# Altium PCB Sampler.PCBDOC (part 7 of 7)
Units mil, origin at the board's own origin, x right, y up, seen from the top; angles counter-clockwise.
Board outline 6299 x 3937 mil, 4 copper layers (Top, GP1(GND), L3, Bot), stack 64.883 mil thick; 567 components, 323 nets, 1698 pads, 817 vias.
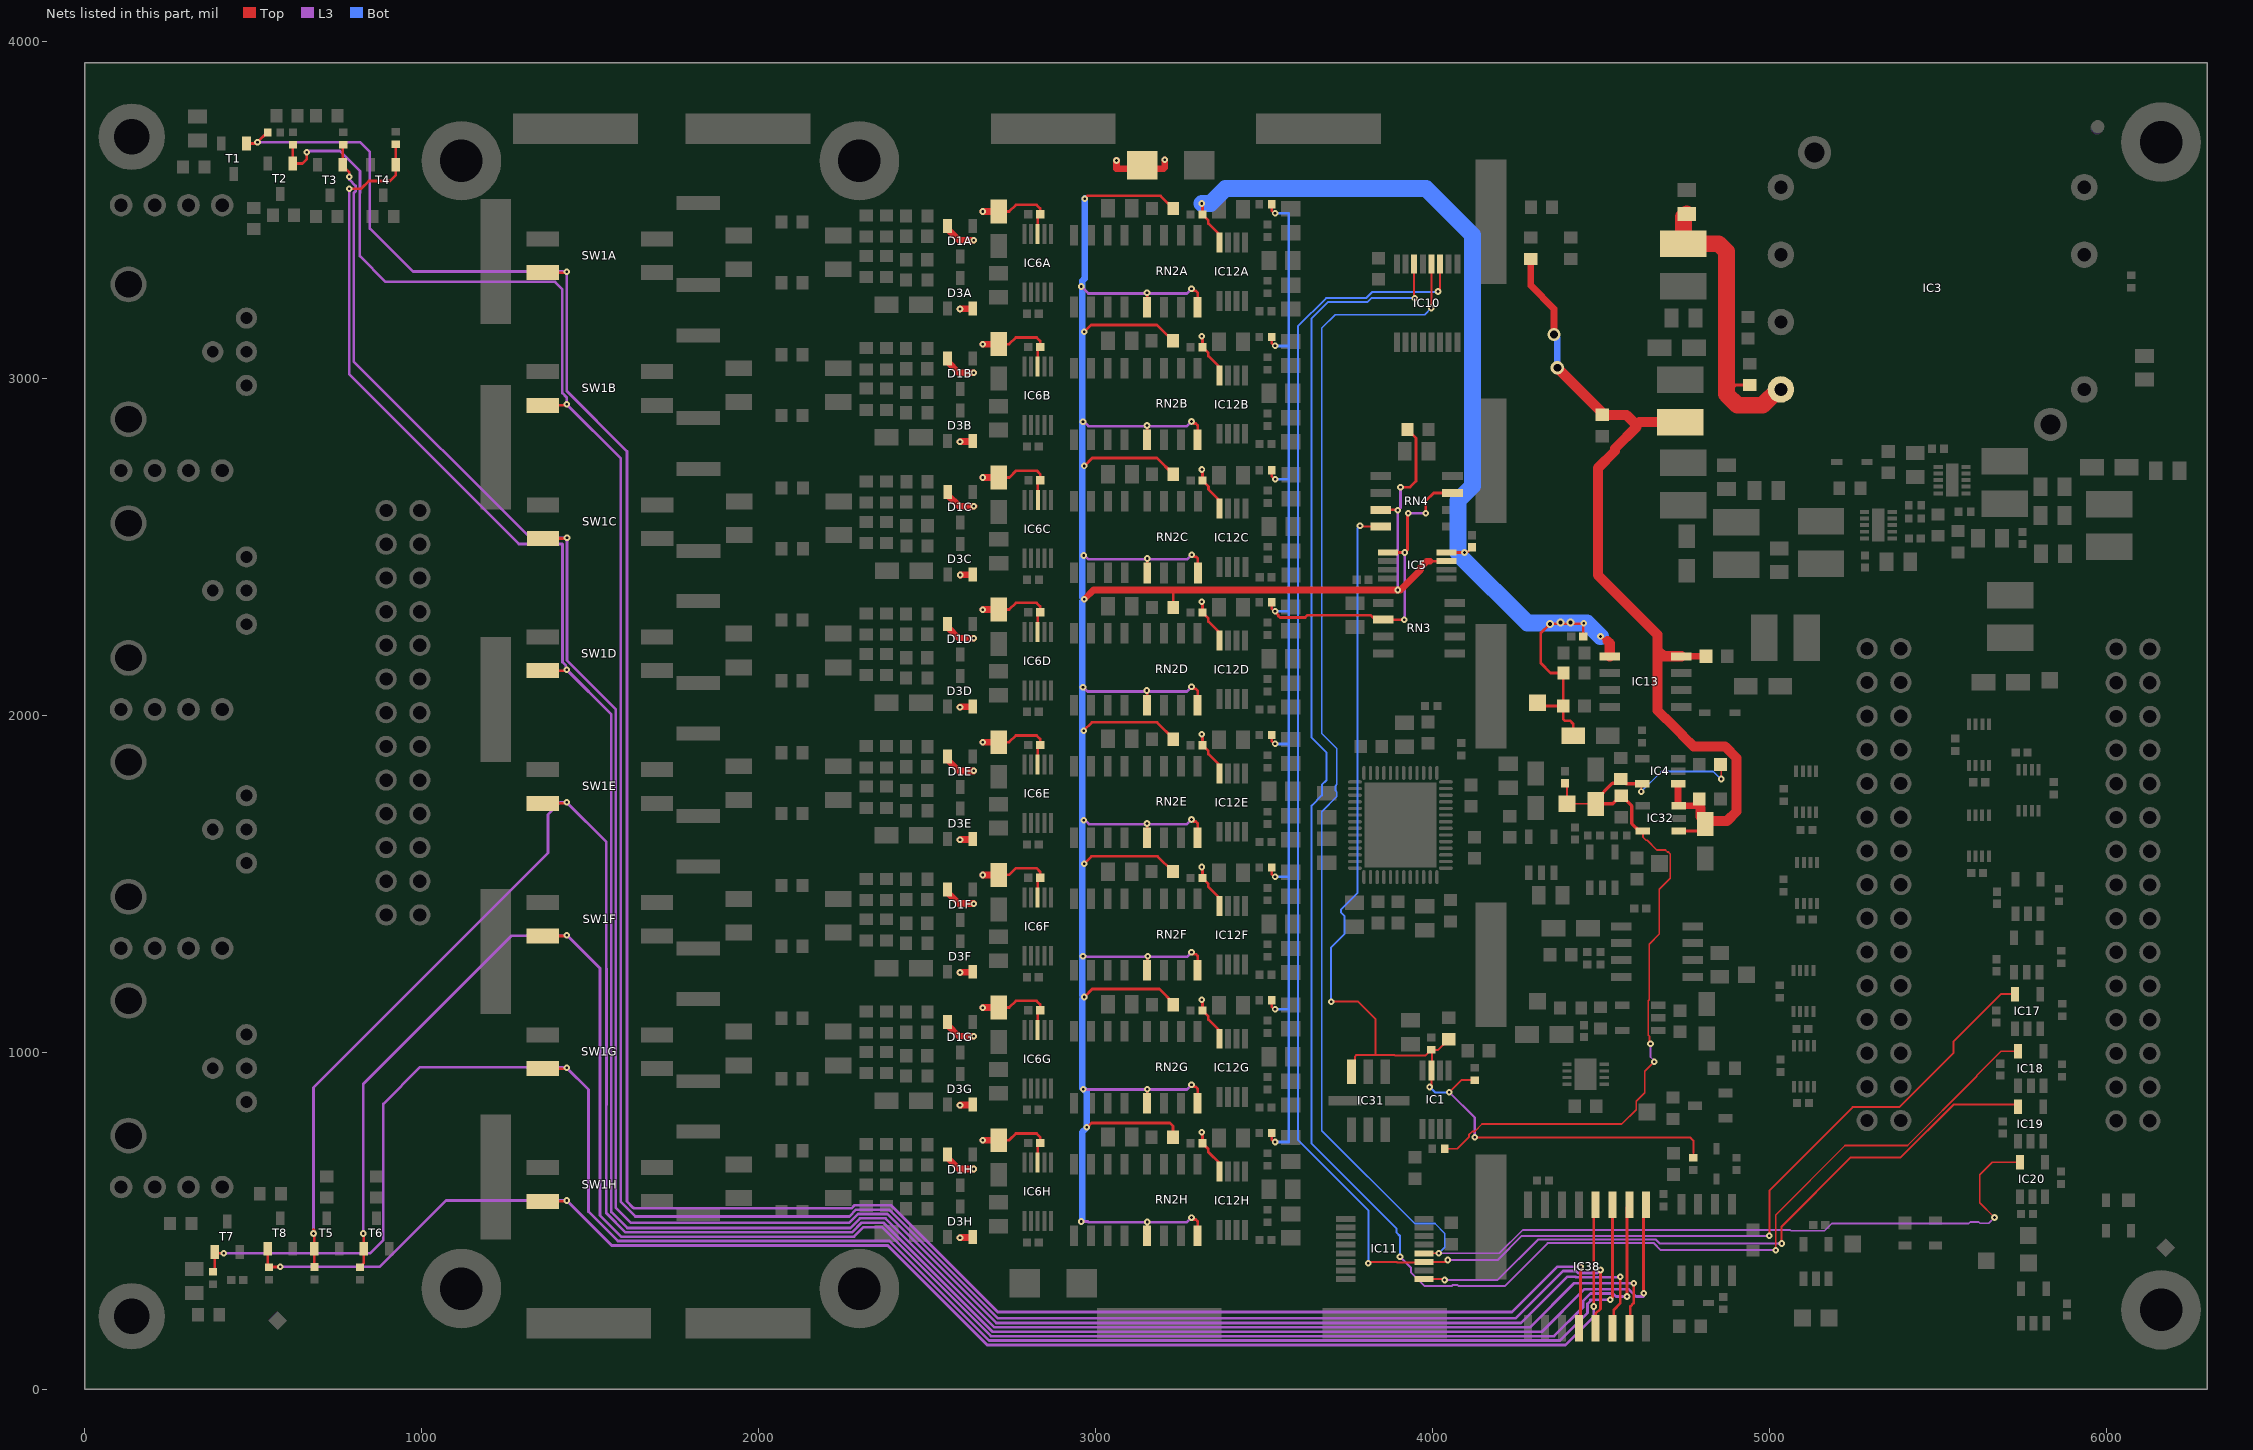
[diagram p8: the nets of this part, all layers, seen from the top]

## Via types
v1: diameter 19.68, hole 7.87, Top to Bot, tented both sides, 772 vias
v2: diameter 23.62, hole 11.81, Top to Bot, tented both sides, 17 vias
v3: diameter 19.68, hole 7.87, Top to Bot, 11 vias
v4: diameter 39.37, hole 23.62, Top to Bot, tented both sides, 7 vias
v5: diameter 23.62, hole 11.81, Top to Bot, 6 vias
v6: diameter 50, hole 28, Top to Bot, 4 vias

## Nets (pads, with @x,y where several pads share a name; then routed paths per layer and width w, separated by ;. In a path a pad name is that pad's centre, name@x,y a point inside that pad or via, vN(x,y) a via of type N, cw(c..) or ccw(c..) an arc to the next point about the centre after c; other vN are vias at no path point) (continued)
P12V0A: C10A.1 C10B.1 C10C.1 C10D.1 C10E.1 C10F.1 C10G.1 C10H.1 C20.2 C30.2 C35A.2 C35B.2 C35C.2 C35D.2 C35E.2 C35F.2 C35G.2 C35H.2 C51.1 C65.2 C70A.2 C70B.2 C70C.2 C70D.2 C70E.2 C70F.2 C70G.2 C70H.2 D1A.2 D1B.2 D1C.2 D1D.2 D1E.2 D1F.2 D1G.2 D1H.2 D3A.2 D3B.2 D3C.2 D3D.2 D3E.2 D3F.2 D3G.2 D3H.2 D8.1 IC5.8 IC6A.8 IC6B.8 IC6C.8 IC6D.8 IC6E.8 IC6F.8 IC6G.8 IC6H.8 IC12A.8 IC12B.8 IC12C.8 IC12D.8 IC12E.8 IC12F.8 IC12G.8 IC12H.8 IC13.1 R142.2 TP7.1 | length 7621.1
  Top w8: C10H.1@2712,739.27 2743.5,739.27 2763.32,759.09 2825,759.09 2835.48,748.62 C35H.2@2835.48,731.03 2828,723.55 IC6H.8@2828,672.71 ; C10G.1@2712,1132.98 2743.5,1132.98 2763.32,1152.8 2825,1152.8 2835.48,1142.32 C35G.2@2835.48,1124.73 2828,1117.25 IC6G.8@2828,1066.41 ; C10F.1@2712,1526.68 2743.5,1526.68 2763.32,1546.5 2825,1546.5 2835.48,1536.02 C35F.2@2835.48,1518.43 2828,1510.96 IC6F.8@2828,1460.11 ; C10E.1@2712,1920.38 2743.5,1920.38 2763.32,1940.2 2825,1940.2 2835.48,1929.72 C35E.2@2835.48,1912.13 2828,1904.66 IC6E.8@2828,1853.81 ; C10D.1@2712,2314.08 2743.5,2314.08 2763.32,2333.9 2825,2333.9 2835.48,2323.42 C35D.2@2835.48,2305.83 2828,2298.36 IC6D.8@2828,2247.51 ; C10B.1@2712,3101.48 2743.5,3101.48 2763.32,3121.3 2825,3121.3 2835.48,3110.82 C35B.2@2835.48,3093.24 2828,3085.76 IC6B.8@2828,3034.92 ; C10A.1@2712,3495.18 2743.5,3495.18 2763.32,3515 2825,3515 2835.48,3504.52 C35A.2@2835.48,3486.94 2828,3479.46 IC6A.8@2828,3428.61 ; C10C.1@2712.49,2706.05 2743.99,2706.05 2763.81,2725.87 2825.49,2725.87 2835.97,2715.4 C35C.2@2835.97,2697.81 2828.49,2690.33 IC6C.8@2828.49,2639.49 ; v1(3314.96,762.8) 3316.93,760.83 C70H.2@3316.93,730.31 3334.65,712.6 3334.65,703.74 3367.13,671.26 IC12H.8@3367.13,646.8 ; v1(3314.96,1156.5) 3316.93,1154.53 C70G.2@3316.93,1124.02 3334.65,1106.3 3334.65,1097.44 3367.13,1064.96 IC12G.8@3367.13,1040.5 ; v1(3314.96,1550.2) 3316.93,1548.23 C70F.2@3316.93,1517.72 3334.65,1500 3334.65,1491.14 3367.13,1458.66 IC12F.8@3367.13,1434.2 ; v1(3314.96,1943.9) 3316.93,1941.93 C70E.2@3316.93,1911.42 3334.65,1893.7 3334.65,1884.84 3367.13,1852.36 IC12E.8@3367.13,1827.9 ; v1(3314.96,2337.6) 3316.93,2335.63 C70D.2@3316.93,2305.12 3334.65,2287.4 3334.65,2278.54 3367.13,2246.06 IC12D.8@3367.13,2221.6 ; v1(3314.96,3125) 3316.93,3123.03 C70B.2@3316.93,3092.52 3334.65,3074.8 3334.65,3065.94 3367.13,3033.46 IC12B.8@3367.13,3009 ; v1(3314.96,3518.7) 3316.93,3516.73 C70A.2@3316.93,3486.22 3334.65,3468.5 3334.65,3459.65 3367.13,3427.17 IC12A.8@3367.13,3402.7 ; v1(3315.45,2729.58) 3317.42,2727.61 C70C.2@3317.42,2697.1 3335.14,2679.38 3335.14,2670.52 3367.62,2638.04 IC12C.8@3367.62,2613.58 ; IC5.8@4041.34,2483.27 v1(4094.49,2483.27) 4101.38,2483.27 C20.2@4117.13,2499.02 ; TP7.1@4311.02,2037.4 4320.87,2027.56 C65.2@4387.8,2027.56 ; C51.1@4417.32,1938.98 4417.32,1974.41 4407.48,1984.25 4391.73,1984.25 4387.8,1988.19 C65.2@4387.8,2027.56 ; C30.2@4446.85,2234.25 4446.85,2271.65 v2(4348.43,2271.65) 4320.87,2244.09 4320.87,2155.51 4350.39,2125.98 R142.2@4387.8,2125.98 C65.2@4387.8,2027.56 ; v1(4498.03,2234.25) 4515.26,2217.03
  Top w20: D1H.2@2560.6,696.37 2560.6,687.31 2593.81,654.09 v1(2638.31,654.09) ; D1G.2@2560.6,1090.07 2560.6,1081.01 2593.81,1047.8 v1(2638.31,1047.8) ; D1F.2@2560.6,1483.77 2560.6,1474.71 2593.81,1441.5 v1(2638.31,1441.5) ; D1E.2@2560.6,1877.47 2560.6,1868.41 2593.81,1835.2 v1(2638.31,1835.2) ; D1D.2@2560.6,2271.17 2560.6,2262.11 2593.81,2228.9 v1(2638.31,2228.9) ; D1B.2@2560.6,3058.57 2560.6,3049.51 2593.81,3016.3 v1(2638.31,3016.3) ; D1A.2@2560.6,3452.28 2560.6,3443.21 2593.81,3410 v1(2638.31,3410) ; D1C.2@2561.09,2663.15 2561.09,2654.09 2594.3,2620.87 v1(2638.8,2620.87) ; v1(2597.78,449.76) 2598.51,450.48 D3H.2@2633.61,450.48 ; v1(2597.78,843.46) 2598.51,844.18 D3G.2@2633.61,844.18 ; v1(2597.78,1237.16) 2598.51,1237.88 D3F.2@2633.61,1237.88 ; v1(2597.78,1630.86) 2598.51,1631.58 D3E.2@2633.61,1631.58 ; v1(2597.78,2024.56) 2598.51,2025.28 D3D.2@2633.61,2025.28 ; v1(2597.78,2811.96) 2598.51,2812.68 D3B.2@2633.61,2812.68 ; v1(2597.78,3205.66) 2598.51,3206.38 D3A.2@2633.61,3206.38 ; v1(2598.28,2416.54) 2599,2417.26 D3C.2@2634.11,2417.26 ; v1(2665,739.09) 2665.18,739.27 C10H.1@2712,739.27 ; v1(2665,1132.8) 2665.18,1132.98 C10G.1@2712,1132.98 ; v1(2665,1526.5) 2665.18,1526.68 C10F.1@2712,1526.68 ; v1(2665,1920.2) 2665.18,1920.38 C10E.1@2712,1920.38 ; v1(2665,2313.9) 2665.18,2314.08 C10D.1@2712,2314.08 ; v1(2665,3101.3) 2665.18,3101.48 C10B.1@2712,3101.48 ; v1(2665,3495) 2665.18,3495.18 C10A.1@2712,3495.18 ; v1(2665.49,2705.87) 2665.67,2706.05 C10C.1@2712.49,2706.05 ; v1(3062.05,3646.37) 3062.05,3622.05 3202.04,3622.05 3205.05,3625.05 v1(3205.05,3648.37)
  Top w30: 4518.7,2220.47 4525.55,2213.62 IC13.1@4525.55,2175.37
  Bot w50: v1(3314.96,3518.7) 3341.54,3518.7 3385.83,3562.99 3980.32,3562.99 4118.11,3425.2 4118.11,2681.1 4074.8,2637.8 4074.8,2483.27 ; 4083.17,2471.95 4281.02,2274.09 4448.35,2274.09 v1(4448.82,2273.62) 4458.66,2273.62 v1(4498.03,2234.25)
  other v2: 4378.94,2275.59 4409.45,2275.59
P13V0: C29.2 C77.1 C112.2 C117.2 IC4.1 IC13.8 IC32.1 IC32.3 L11.2 R3.2 | length 2746.8
  Top w10: IC32.1@4730.32,1656.87 4789.45,1656.87 4809.06,1676.48 C77.1@4809.06,1677.17
  Top w20: R3.2@4291.34,3354.33 4291.34,3275.31 4360.24,3206.41 v4(4360.24,3129.92) ; IC4.1@4728.35,1796.81 4728.35,1732.5 4729.17,1731.67 IC32.3@4730.32,1731.67 4787.52,1731.67 ; IC13.8@4738.15,2175.37 4810.85,2175.37 C112.2@4811.02,2175.2 ; C117.2@4791.34,1751.97 4787.52,1748.15 4787.52,1731.67 ; 4794.29,1724.9 4787.52,1731.67
  Top w30: v4(4370.08,3031.5) C29.2@4506.4,2895.18 ; C29.2@4502.95,2891.73 4575.79,2891.73 4575.79,2890.75 4605.32,2861.22 4605.32,2856.04 4541.02,2791.75 4541.02,2784.25 4490.16,2733.39 4490.16,2416.34 4667.32,2239.17 4667.32,2193.9 ; 4614.17,2870.08 L11.2@4734.25,2870.08 ; IC13.8@4738.15,2175.37 4685.85,2175.37 4667.32,2193.9 ; 4794.29,1724.9 4794.29,1700.79 4808.07,1687.01 4874.02,1687.01 4901.57,1714.57 4901.57,1873.77 4867.86,1907.48 4774.61,1907.48 4741.69,1940.39 4741.69,1941.54 4692.21,1991.02 4691.06,1991.02 4667.32,2014.76 4667.32,2193.9
  Bot w20: v4(4360.24,3129.92) 4370.08,3120.08 v4(4370.08,3031.5)
P13V0S: C26.2 IC3.7 L10.1 R7.2 | length 928.3
  Top w8: 4872.05,2952.76 4899.61,2980.31 R7.2@4940.94,2980.31
  Top w50: C26.2@4753.94,3488.19 4744.09,3478.35 L10.1@4744.09,3399.61 4848.43,3399.61 4872.05,3375.98 4872.05,2952.76 4904.66,2920.15 4978.71,2920.15 5025.69,2967.13 IC3.7@5033.46,2967.13
PGIA-CS: IC10.12 IC11.12 IC20.5 | length 5482
  Top w5: IC11.12@3974.6,403.8 v1(4017.98,403.8) ; v1(3996.06,3208.66) 3996.44,3209.04 IC10.12@3996.44,3339.26 ; v1(5667.36,509.88) 5623.52,553.73 5623.52,636.81 5660.89,674.19 IC20.5@5742.38,674.19
  L3 w5: v1(4017.98,403.8) 4198.01,403.8 4267.28,473.07 5061.26,473.07 5064.04,470.29 5162.93,470.29 5184.72,492.07 5590.68,492.07 5595.12,496.52 5620.5,496.52 5624.48,492.54 5650.02,492.54 v1(5667.36,509.88)
  Bot w5: v1(3996.06,3208.66) 3976.38,3188.98 3710.63,3188.98 3671.26,3149.61 3671.26,2472.89 3671.37,2472.78 3671.37,2432.73 3671.26,2432.62 3671.26,1946.43 3715.95,1901.74 3715.95,1795.5 3712.07,1791.62 3712.07,1776.59 3715.95,1772.7 3715.95,1759.05 3671.26,1714.36 3671.26,767.72 3946.85,492.13 4006.89,492.13 4036.41,462.6 4036.41,422.23 v1(4017.98,403.8)
PGIA-MISO: IC11.9 IC19.5 | length 2020.8
  Top w6: IC11.9@3974.6,327.03 4033.21,327.03 v1(4035.43,324.8) ; v1(5035.68,433.09) 5035.68,483.3 5240.93,688.55 5389.01,688.55 5545.59,845.13 5730.43,845.13 IC19.5@5737.1,838.46
  L3 w6: v1(4035.43,324.8) 4192.91,324.8 4312.84,444.73 4661.46,444.73 4673.12,433.07 v1(5035.68,433.09)
PGIA-MOSI: IC10.14 IC18.5 | length 5612.3
  Top w5: v1(5017.72,413.39) 5017.72,517.64 5223.57,723.49 5409.1,723.49 5614.33,928.72 5614.33,931.34 5686.28,1003.29 IC18.5@5737.54,1003.29
  Top w6: IC10.14@3945.26,3339.26 3945.26,3239.78 v1(3946.85,3238.19)
  L3 w6: v1(3903.19,393.7) 3935.17,361.72 3935.17,347.57 3976.38,306.36 4056.72,306.36 4059.54,309.18 4074.32,309.18 4077.14,306.36 4213.84,306.36 4341.21,433.73 4656.91,433.73 4677.25,413.39 v1(5017.72,413.39)
  Bot w6: v1(3903.19,393.7) 3903.19,455.08 3893.37,464.9 3893.37,476.71 3640.76,729.32 3640.76,1732.28 3671.26,1762.78 3671.26,1793.94 3685.45,1808.13 3685.45,1889.11 3640.76,1933.8 3640.76,2445.25 3640.87,2445.37 3640.87,2460.15 3640.76,2460.26 3640.76,3178.16 3689.79,3227.19 3806.93,3227.19 3817.93,3238.19 v1(3946.85,3238.19)
PGIA-SCK: IC10.11 IC11.11 IC17.5 | length 5760.1
  Top w6: v1(3809.06,374.02) 3813.25,378.21 3893.44,378.21 3895.8,375.86 3972.25,375.86 IC11.11@3974.6,378.21 4039.63,378.21 v1(4045.28,383.86) ; v1(4015.75,3257.87) 4022.03,3264.16 IC10.11@4022.03,3339.26 ; v1(4999.02,455.73) 4999.02,590.05 5246.25,837.28 5384.48,837.28 5545.76,998.57 5545.76,1032.77 5686.04,1173.05 IC17.5@5728.23,1173.05
  L3 w6: v1(4045.28,383.86) 4192.91,383.86 4264.78,455.73 v1(4999.02,455.73)
  Bot w6: v1(3809.06,374.02) 3809.06,531.5 3600.27,740.28 3600.27,3154.55 3683.91,3238.19 3802.37,3238.19 3820.21,3256.03 4013.91,3256.03 v1(4015.75,3257.87)
REF_P1V7066: IC5.7 R72.2 R73A.1 R73B.1 R73C.1 R73D.1 R73E.1 R73F.1 R73G.1 R73H.1 RN2A.5 RN2A.8 RN2B.5 RN2B.8 RN2C.5 RN2C.8 RN2D.5 RN2D.8 RN2E.5 RN2E.8 RN2F.5 RN2F.8 RN2G.5 RN2G.8 RN2H.5 RN2H.8 RN4.7 | length 10384.3
  Top w8: v1(2964.57,1954.72) 2989.17,1979.33 3182.09,1979.33 3230.31,1931.1 R73E.1@3230.31,1929.13 ; v1(2966.39,1164.37) 2990.02,1187.99 3188.98,1187.99 3230.31,1146.65 R73G.1@3230.31,1141.73 ; v1(2966.39,1560.04) 2988.05,1581.69 3184.06,1581.69 R73F.1@3229.33,1536.42 ; v1(2966.39,2740.16) 2990.02,2763.78 3182.09,2763.78 R73C.1@3230.31,2715.55 ; v1(2966.39,3138.78) 2986.08,3158.46 3182.09,3158.46 R73B.1@3229.33,3111.22 ; v1(2967.52,3533.46) 2975.54,3541.48 3192.77,3541.48 R73A.1@3230.31,3503.94 ; v1(2973.57,777.6) 2975.43,777.6 2988.19,790.35 3220.47,790.35 3229.33,781.5 R73H.1@3229.33,748.03 ; v1(3151.57,2073.82) 3152.77,2072.62 RN2D.5@3152.77,2030.53 ; v1(3152.56,1679.13) 3152.77,1678.92 RN2E.5@3152.77,1636.83 ; v1(3152.56,2860.24) 3152.77,2860.02 RN2B.5@3152.77,2817.93 ; v1(3152.56,3253.94) 3152.77,3253.72 RN2A.5@3152.77,3211.63 ; RN2H.5@3152.77,455.72 v1(3152.77,496.83) ; RN2G.5@3152.77,849.43 v1(3152.77,890.96) ; RN2F.5@3152.77,1243.13 3152.77,1283.68 v1(3154.53,1285.43) ; RN2C.5@3153.27,2422.5 3153.27,2465.27 v1(3153.54,2465.55) ; R73D.1@3230.31,2319.88 3230.31,2369.04 3233.27,2371.99 ; v1(3284.45,509.84) 3290.35,503.94 3297.24,503.94 3302.77,498.41 RN2H.8@3302.77,455.72 ; v1(3284.45,903.54) 3290.35,897.64 3297.24,897.64 3302.77,892.11 RN2G.8@3302.77,849.43 ; v1(3284.45,1297.24) 3290.35,1291.34 3297.24,1291.34 3302.77,1285.81 RN2F.8@3302.77,1243.13 ; v1(3284.45,1690.94) 3290.35,1685.04 3297.24,1685.04 3302.77,1679.51 RN2E.8@3302.77,1636.83 ; v1(3284.45,2084.65) 3290.35,2078.74 3297.24,2078.74 3302.77,2073.21 RN2D.8@3302.77,2030.53 ; v1(3284.45,2872.05) 3290.35,2866.14 3297.24,2866.14 3302.77,2860.61 RN2B.8@3302.77,2817.93 ; v1(3284.45,3265.75) 3290.35,3259.84 3297.24,3259.84 3302.77,3254.31 RN2A.8@3302.77,3211.63 ; v1(3284.94,2476.62) 3290.85,2470.72 3297.74,2470.72 3303.27,2465.19 RN2C.8@3303.27,2422.5 ; RN4.7@3846.46,2609.84 3895.08,2609.84 v1(3896.65,2608.27) ; v1(3904.53,2677.17) 3933.07,2677.17 3950.79,2694.88 3950.79,2822.83 R72.2@3925.2,2848.43 ; 3992.05,2457.68 IC5.7@4041.34,2457.68
  Top w20: v1(2966.39,2344.49) 2993.9,2371.99 3233.27,2371.99 3904.47,2371.99 3964.33,2431.85 3964.33,2438.44 3983.57,2457.68 3992.05,2457.68
  L3 w8: v1(2957.68,498.03) 2976.38,498.03 2978.35,496.06 3270.67,496.06 v1(3284.45,509.84) ; v1(2957.68,3272.64) 2978.35,3251.97 3270.67,3251.97 v1(3284.45,3265.75) ; v1(2962.6,1285.43) 2964.57,1283.46 3270.67,1283.46 v1(3284.45,1297.24) ; v1(2962.74,2083.76) 2975.64,2070.87 3270.67,2070.87 v1(3284.45,2084.65) ; v1(2963.73,890.79) 2964.76,889.76 3270.67,889.76 v1(3284.45,903.54) ; v1@2964.08,2872.54 2978.35,2858.27 3270.67,2858.27 v1(3284.45,2872.05) ; v1@2965.93,2475.75 2978.84,2462.84 3271.16,2462.84 v1(3284.94,2476.62) ; v1@2966.5,1690.84 2980.17,1677.17 3270.67,1677.17 v1(3284.45,1690.94) ; v1(3896.65,2372.05) v1(3896.65,2608.27) 3904.53,2616.14 v1(3904.53,2677.17)
  Bot w20: v1(2957.68,498.03) 2960.39,500.75 2960.39,763.24 2973.57,776.42 v1(2973.57,777.6) 2973.57,880.95 v1(2963.73,890.79) 2960.39,894.13 2960.39,1158.37 v1(2966.39,1164.37) 2960.39,1170.37 2960.39,1954.72 2960.39,2338.49 v1(2966.39,2344.49) 2960.39,2350.49 2960.39,2740.16 2960.39,3288.83 2967.52,3295.96 v1(2967.52,3533.46)
  other v1: 2964.71,1689.06 2964.71,2474.53 2962.74,2871.2
REF_P2V048: IC5.1 R50A.1 R50B.1 R50C.1 R50D.1 R50E.1 R50F.1 R50G.1 R50H.1 RN3.6 RN4.3 | length 4267.9
  Top w8: R50H.1@3522.44,760.83 3522.44,742.32 3531.5,733.27 v1(3532.48,734.25) ; R50G.1@3522.44,1154.53 3522.44,1136.02 3531.5,1126.97 v1(3532.48,1127.95) ; R50F.1@3522.44,1548.23 3522.44,1529.72 3531.5,1520.67 v1(3532.48,1521.65) ; R50E.1@3522.44,1941.93 3522.44,1923.43 3531.5,1914.37 v1(3532.48,1915.35) ; R50D.1@3522.44,2335.63 3522.44,2317.13 3541.56,2298.01 3541.56,2295.53 3546.83,2290.26 3621.95,2290.26 3628.94,2297.24 3815.94,2297.24 3829.33,2283.86 RN3.6@3853.35,2283.86 3914.96,2283.86 v1(3915.35,2283.46) ; R50B.1@3522.44,3123.03 3522.44,3104.53 3531.5,3095.47 v1(3532.48,3096.46) ; R50A.1@3522.44,3516.73 3522.44,3498.23 3531.5,3489.17 v1(3532.48,3490.16) ; R50C.1@3522.93,2727.61 3522.93,2709.1 3531.99,2700.05 v1(3532.97,2701.03) ; IC5.1@3868.11,2483.27 v1(3917.32,2483.27) 3925.2,2491.14 3925.2,2597.44 v1(3927.17,2599.41) ; v1(3979.33,2599.41) 3979.33,2635.83 4003.35,2659.84 RN4.3@4059.06,2659.84
  L3 w8: v1(3915.35,2283.46) 3917.32,2285.43 v1(3917.32,2483.27) ; v1(3927.17,2599.41) v1(3979.33,2599.41)
  Bot w8: v1@3535,734.09 3572.83,734.09 3572.83,1127.8 ; v1@3535,1127.8 3572.83,1127.8 ; v1@3535,1521.5 3572.83,1521.5 ; v1@3535,1915.2 3572.83,1915.2 ; v1@3535,2308.9 3572.83,2308.9 ; v1@3535,3096.3 3572.83,3096.3 ; v1@3535,3490 3572.83,3490 3572.83,3096.3 ; v1@3535.49,2700.87 3572.83,2700.87 ; 3572.83,1127.8 3572.83,1521.5 ; 3572.83,1521.5 3572.83,1915.2 ; 3572.83,1915.2 3572.83,2308.9 ; 3572.83,2308.9 3572.83,2700.87 ; 3572.83,2700.87 3572.83,3096.3
  other v1: 3532.48,2309.06
REF_P4V096: C2.2 IC1.7 IC31.7 R1.1 R22.1 R77.2 RN4.8 | length 3255.3
  Top w6: v1(3698.82,1150.59) 3778.85,1150.59 3830.15,1099.29 3830.15,991.98 ; IC31.7@3759.06,943.06 3769.83,953.84 3769.83,988.47 3773.35,991.98 3830.15,991.98 ; v1(3784.45,2562.99) 3787.6,2559.84 RN4.8@3846.46,2559.84 ; v1(3990.94,897.25) 3996.06,902.37 IC1.7@3996.06,945.87 3997.55,947.35 3997.55,1006.1 R1.1@3996.24,1007.41 ; C2.2@4048.23,1039.37 4047.24,1039.37 4031.54,1023.67 4031.54,1022.68 4016.27,1007.41 R1.1@3996.24,1007.41 ; v1(4049.67,882.11) 4085.1,917.54 R77.2@4125,917.54 ; v1(4125,748.03) 4763.78,748.03 4773.62,738.19 4773.62,700.79 ; 3830.15,991.98 3886.95,991.98 3888.85,990.09 3978.13,990.09 3995.45,1007.41 R1.1@3996.24,1007.41
  L3 w6: v1(4049.67,882.11) 4125,806.78 v1(4125,748.03)
  Bot w6: v1(3698.82,1150.59) 3698.82,1311.65 3738.31,1351.13 3738.31,1405.03 3728.8,1414.54 3728.8,1424.66 3777.56,1473.43 3777.56,1960.99 3777.69,1961.11 3777.69,1975.89 3777.56,1976.02 3777.56,2556.1 v1(3784.45,2562.99) ; v1(3990.94,897.25) 4007.17,881.03 4048.59,881.03 v1(4049.67,882.11)
REF_VCC: C45.2 C81.2 C116.2 C118.1 IC4.5 IC32.5 R15.1 R26.2 TP8.1 | length 2446.3
  Top w5: R15.1@4035.74,713.91 4073.17,713.91 4107.66,748.41 4107.66,755.21 4117.82,765.37 4124.63,765.37 4146.54,787.29 4560.95,787.29 4603.81,830.15 4603.81,854.57 4629.19,879.95 4629.19,944.48 v1(4657.39,972.68) ; C45.2@4392.8,1798.63 4398.83,1792.59 TP8.1@4398.83,1737.89 C118.1@4483.5,1737.89 ; v1(4619.44,1773.9) 4619.44,1788.48 IC4.5@4624.91,1793.95 ; IC32.5@4624.02,1656.87 4624.02,1638.54 4633.01,1629.55 4636.65,1629.55 4665.91,1600.29 4691.06,1600.29 4696.84,1594.51 4699.64,1594.51 4705.41,1588.74 4705.41,1516.75 4672.91,1484.25 4672.91,1351.48 4642.7,1321.26 4642.7,1156.26 4640.14,1153.7 4640.14,1051.03 4643.7,1047.46 4643.7,1027.96 v1(4646.36,1025.3) ; C116.2@4854.16,1854.52 4856.3,1852.37 v1(4856.3,1811.27)
  Top w10: IC4.5@4622.05,1796.81 4574.17,1796.81 4559.96,1811.02 R26.2@4557.99,1811.02 4545.28,1798.3 4533.68,1798.3 4483.5,1748.13 4483.5,1737.89 C118.1@4483.5,1737.3 4535.03,1737.3 4558.98,1761.24 4560.94,1761.24 4591,1731.18 4591,1679.06 4613.19,1656.87 IC32.5@4624.02,1656.87
  L3 w5: v1(4646.36,1025.3) 4646.36,986.18 4657.39,975.16 v1(4657.39,972.68)
  Bot w5: v1(4619.44,1773.9) 4679.23,1833.68 4832.86,1833.68 4855.28,1811.27 v1(4856.3,1811.27)
TERM_STAT0: IC38.4 R5.2 SW1A.2 T1.1 | length 7404.6
  Top w8: T1.1@480.32,3696.85 509.05,3696.85 v1(512.99,3700.79) R5.2@542.52,3730.32 ; SW1A.2@1359.92,3313.77 1428.03,3313.77 v1(1430.79,3316.53) ; IC38.4@4433.66,181.1 4438.98,186.42 v1(4438.98,364.17)
  L3 w8: v1(512.99,3700.79) 816.93,3700.79 846.46,3671.26 846.46,3444.88 974.41,3316.93 1430.39,3316.93 v1(1430.79,3316.53) 1430.79,2961.93 1609.25,2783.46 1609.25,557.6 1627.83,539.02 1628.3,539.02 1629.92,537.4 2275.13,537.4 2284.17,546.44 2392.64,546.44 2709.55,229.54 4235.44,229.54 4370.08,364.17 v1(4438.98,364.17)
TERM_STAT1: IC38.5 R12.2 SW1B.2 T2.1 | length 7362.3
  Top w8: R12.2@620.08,3692.13 618.11,3690.16 T2.1@618.11,3637.8 646.65,3637.8 659.45,3650.59 v1(659.45,3671.26) ; SW1B.2@1359.92,2920.07 1428.03,2920.07 v1(1430.79,2922.83) ; IC38.5@4483.66,181.1 4483.66,224.73 4498.03,239.1 v1(4498.03,354.33)
  L3 w8: v1(659.45,3671.26) 662.99,3674.8 757.87,3674.8 817.27,3615.4 817.27,3549.8 816.93,3549.46 816.93,3362.47 892.98,3286.42 1395.67,3286.42 1417.79,3264.3 1417.79,2956.54 1430.79,2943.54 v1(1430.79,2922.83) 1590.55,2763.06 1590.55,557.09 1634.33,513.31 2269.42,513.31 2289.55,533.44 2387.26,533.44 2709.35,211.35 4246.78,211.35 4386.61,351.17 4425.33,351.17 4431.17,345.33 4489.03,345.33 v1(4498.03,354.33)
TERM_STAT2: IC38.6 R13.2 SW1C.2 T3.1 | length 6996.9
  Top w8: R13.2@767.72,3692.13 765.75,3690.16 T3.1@765.75,3633.86 765.75,3629.92 785.43,3610.24 v1(785.43,3598.43) ; SW1C.2@1360.42,2524.64 1428.53,2524.64 v1(1431.28,2527.4) ; IC38.6@4533.66,181.1 4537.4,184.84 4537.4,236.22 4557.09,255.91 v1(4557.09,334.65)
  L3 w8: v1(785.43,3598.43) 785.43,3589.64 804.27,3570.8 804.27,3555.19 798.43,3549.35 798.43,3049.99 1321.03,2527.4 v1(1431.28,2527.4) 1431.28,2163.21 1575.99,2018.5 1575.99,540.15 1621.83,494.31 2268.81,494.31 2294.94,520.44 2381.87,520.44 2705.31,197 4261.96,197 4399.61,334.65 4423.47,334.65 4425.79,332.33 4554.77,332.33 v1(4557.09,334.65)
TERM_STAT3: IC38.7 R49.2 SW1D.2 T4.1 | length 7148.8
  Top w8: v1(785.43,3562.99) 820.87,3562.99 843.5,3585.63 906.5,3585.63 923.23,3602.36 T4.1@923.23,3633.86 923.23,3690.16 R49.2@925.2,3692.13 ; SW1D.2@1359.92,2132.67 1428.03,2132.67 v1(1430.79,2135.42) ; IC38.7@4583.66,181.1 4586.61,184.06 4586.61,246.06 4596.46,255.91 v1(4596.46,314.96)
  L3 w8: v1(785.43,3562.99) 785.43,3011.81 1288.69,2508.56 1418.28,2508.56 1418.28,2157.82 1428.03,2148.07 1428.03,2132.67 v1(1430.79,2135.42) 1562.99,2003.22 1562.99,526.57 1610.4,479.16 2272.05,479.16 2300.32,507.44 2376.49,507.44 2699.93,184 4288.33,184 4419.29,314.96 v1(4596.46,314.96)
TERM_STAT4: IC38.9 R68.2 SW1E.2 T5.1 | length 6638.2
  Top w8: R68.2@679.13,362.99 681.1,364.96 T5.1@681.1,417.32 681.1,472.44 679.13,474.41 ; SW1E.2@1359.92,1738.96 1428.03,1738.97 v1(1430.79,1741.72) ; v1(4625.98,285.43) 4625.98,539.57 IC38.9@4633.66,547.24
  L3 w8: v1(679.13,462.6) 679.13,895.67 1375,1591.54 1375,1705.71 1411.01,1741.72 v1(1430.79,1741.72) 1548.23,1624.28 1548.23,1248.97 1548.43,1248.76 1548.43,844.29 1548.23,844.09 1548.23,522.64 1604.7,466.16 2277.43,466.16 2305.71,494.44 2371.1,494.44 2694.54,171 4324.54,171 4451.13,297.59 4581.42,297.59 4603.42,275.59 4625.98,275.59 v1(4625.98,285.43)
TERM_STAT5: IC38.10 R69.2 SW1F.2 T6.1 | length 5841
  Top w8: R69.2@816.93,362.99 828.74,374.8 T6.1@828.74,417.32 828.74,460.63 v1(826.77,462.6) ; SW1F.2@1359.92,1345.27 1428.03,1345.27 v1(1430.79,1348.02) ; v1(4576.77,275.59) 4576.77,540.35 IC38.10@4583.66,547.24
  L3 w8: v1(826.77,462.6) 826.77,905.51 1267.31,1346.05 1428.82,1346.05 v1(1430.79,1348.02) 1529.21,1249.6 1529.21,516.06 1592.11,453.16 2282.82,453.16 2311.09,481.44 2365.72,481.44 2689.16,158 4360.76,158 4446.5,243.75 4446.5,262.13 4468.96,284.59 4535.36,284.59 4544.36,275.59 v1(4576.77,275.59)
TERM_STAT6: IC38.11 R70.2 SW1G.2 T7.1 | length 5635.6
  Top w8: R70.2@383.86,353.15 385.83,355.12 T7.1@385.83,407.48 389.76,403.54 v1(413.39,403.54) ; SW1G.2@1359.92,951.57 1428.03,951.57 v1(1430.79,954.32) ; v1(4527.56,265.75) 4533.66,271.85 IC38.11@4533.66,547.24
  L3 w8: v1(413.39,403.54) 846.46,403.54 886.67,443.76 886.67,847.3 995.66,956.29 1428.82,956.29 v1(1430.79,954.32) 1495.08,890.03 1495.08,527.56 1582.47,440.16 2388.61,440.16 2683.77,145 4377.28,145 4459.5,227.22 4459.5,253.87 4468.5,262.87 4468.5,265.75 v1(4527.56,265.75)
TERM_STAT7: IC38.12 R71.2 SW1H.2 T8.1 | length 4684.1
  Top w8: T8.1@543.31,417.32 543.31,370.87 551.18,362.99 579.53,362.99 v1(580.71,364.17) ; SW1H.2@1359.92,557.86 1428.03,557.86 v1(1430.79,560.62) ; v1(4478.35,246.06) 4478.35,541.93 IC38.12@4483.66,547.24
  L3 w8: v1(580.71,364.17) 875.98,364.17 1072.43,560.62 v1(1430.79,560.62) 1564.28,427.13 2383.26,427.13 2678.39,132 4393.81,132 4478.35,216.54 v1(4478.35,246.06)
pads on no net: FTG1.FTG2 FTG2.FTG2 FTG3.1 FTG4.1 FTG5.1 FTG6.1 IC3.9 IC8.4 IC9.5 IC26.4 IC38.13 IC40.5 J3.6 J3.7 J4.6 J4.7 J5.6 J5.7 J6.6 J6.7

## Polygon pours and split planes (outlines as drawn)
no net on Top "ML1_BAL" (solid, pour order 26): 12.97,3909.45 6277.56,3909.45 6277.56,27.56 24.57,27.56
N12V0A on Top "ML1_BAL" (solid, remove dead copper, pour order 18): 4599.86,1097.44 4599.86,815.78 4309.05,815.78 4309.05,1082.68 4331.69,1105.31 4333.66,1107.28 4590.55,1107.28
NetC32_2 on Top "Top Overlay-No Net" (solid, remove dead copper, pour order 2): 6220.97,3023.62 6220.97,2570.47 5922,2570.47 5922,2739.47 5922,2789.86 5922,3023.62
P12V0 on Top "ML1_BAL" (solid, remove dead copper, pour order 16): 6258.23,701.1 6258.23,2561.02 5825.16,2561.02 5825.16,2321.22 6061.38,2321.22 6061.38,1888.15 6100.75,1848.78 6140.12,1809.41 6140.12,1612.56 6140.12,984.61 5982.64,827.13 5982.64,701.1
P12V0A on Top "ML1_BAL" (solid, remove dead copper, pour order 20): 4573.82,2155.51 4573.82,2218.5 4523.62,2268.7 4490.16,2302.17 4322.83,2302.17 4304.13,2302.17 4275.59,2273.62 4268.7,2266.73 4268.7,2070.87 4268.7,2026.57 4295.28,2000 4336.61,1958.66 4336.61,1924.21 4336.61,1915.35 4363.19,1888.78 4446.85,1888.78 4453.74,1888.78 4469.49,1904.53 4470.47,1905.51 4470.47,1962.6 4470.47,2134.84 4486.22,2150.59 4489.17,2153.54 4571.85,2153.54
no net on Bot "ML1_BAL" (solid, pour order 24): 12.97,3909.45 6277.56,3909.45 6277.56,27.56 24.57,27.56
P12V0 on Bot "NONET_L06_P-001" (solid, remove dead copper, pour order 25): 5213.58,697.97 5213.58,834.9 5237.78,859.09 5239.59,857.28 5314.96,857.28 5338.58,880.91 5338.58,918.14 5364.78,944.34 5905.22,944.34 5999.16,850.39 6035.37,850.39 6059.65,868.62 6060.38,963.56 6212.6,963.56 6212.6,700.02
N12V0A on Bot "ML1_BAL" (solid, remove dead copper, pour order 4): 2500.71,3524.33 2500.71,373.31 2608.27,265.75 2854.33,265.75 3523.62,265.75 3523.62,393.7 2866.14,393.7 2615.2,393.7 2578.74,430.16 2578.74,757.87 2578.74,3523.62 2568.9,3533.46 2509.84,3533.46
N12V0A on Bot "ML1_BAL" (solid, remove dead copper, pour order 10): 3464.57,3248.03 3478.95,3248.03 3523.62,3203.36 3523.62,393.7 3484.25,354.33 3444.88,354.33 3425.2,374.02 3418.31,380.91 3418.31,520.01 3418.31,3241.14 3425.2,3248.03
P12V0A on Bot "ML1_BAL" (solid, remove dead copper, pour order 6): 2657.48,403.54 2618.11,403.54 2598.43,423.23 2588.58,433.07 2588.58,485.28 2588.58,3543.31 2618.11,3572.83 2736.22,3690.94 3188.98,3690.94 3350.4,3690.94 3395.67,3645.67 3395.67,3533.46 3395.67,639.76 3375.98,620.08 3356.3,620.08 3340.91,620.08 3257.87,703.12 3257.87,3503.94 3248.03,3513.78 3238.19,3523.62 2962.6,3523.62 2903.54,3523.62 2883.86,3503.94 2873.13,3493.21 2736.22,3493.21 2735.34,3493.21 2716.54,3474.41 2716.54,462.6 2657.48,403.54 2627.95,403.54
P3V3 on L3 "ML1_BAL" (solid, remove dead copper, pour order 12): 3937.01,708.66 3937.01,236.22 4055.12,118.11 4921.26,118.11 6262.8,118.11 6254.92,682.09 5932.09,681.1 5934.05,836.76 6141.73,1044.44 6141.73,2283.46 5275.59,2283.46 4133.86,2283.46 3937.01,2086.61
GND on L3 "ML1_BAL" (solid, remove dead copper, pour order 22): 11.36,3918.31 6312.01,3918.31 6312.01,2587.6 6277.56,2553.15 6272.64,2558.07 5761.81,2558.07 5717.52,2513.78 5717.52,2337.6 4086.61,2337.6 3998.03,2249.02 3894.69,2145.67 3894.69,18.7 58.07,18.7 26.09,50.68
P12V0 on L3 "ML1_BAL" (solid, remove dead copper, pour order 14): 5957.68,702.76 5957.68,834.04 6141.73,1017.47 6141.73,2305.12 6084.65,2362.2 5866.14,2362.2 5826.77,2362.2 5787.4,2401.57 5787.4,2480.32 5826.77,2519.68 6074.8,2519.68 6259.84,2519.68 6259.84,702.76
GND on GP1(GND) (split plane): 6278.9,20.1 20.1,20.1 20.1,3916.9 4478.84,3916.9 4478.84,3344.73 4488.68,3334.89 4488.68,2665.6 4868.85,2285.43 5488.19,2285.43 5488.19,2341.54 4881.64,2341.54 4518.21,2704.97 4518.21,3398.41 4518.21,3916.9 6278.9,3916.9

## Keep-outs
Top:
  lines w3.94: 239.17,120.08 239.17,177.17 247.05,185.04 247.05,197.83 ; 239.17,319.88 239.17,268.7 247.05,260.83 247.05,240.16
L3:
  lines w3.94: 239.17,119.09 239.17,177.17 247.05,185.04 247.05,262.52 239.17,270.39 239.17,319 ; 249.02,3603.35 249.02,3817.91
Bot:
  lines w3.94: 239.17,120.08 239.17,174.21 250,185.04 250,254.92 239.17,265.75 239.17,318.9 ; 249.02,3665.35 249.02,3773.62
KeepOutLayer:
  drawing of 3473 lines, arcs and shapes, not listed

## Other copper
Top:
  rectangle net N12V0A: 4359.37,945.03 4378.44,964.71
  region net NetB1_1: 301.59,3626.86 301.59,3721.46 281.76,3721.46 281.76,3626.86
  rectangle net NetB1_1: 210.06,3706.29 332.68,3726.12
  rectangle net NetB2_1: 171.26,207.05 335.63,232.28
  rectangle net GND: 4427.16,1080.71 4448.82,1092.52
  rectangle net GND: 4843.5,1723.47 4861.22,1748.03
  rectangle net GND: 755.91,3770.67 777.56,3788.39
  rectangle net GND: 3349.41,3612.2 3365.16,3630.91
  rectangle net GND: 4945.87,2628.94 4964.02,2645.67
  rectangle net P6V0: 5263.65,2519.28 5269.02,2530.82
  rectangle net P6V0: 5264.64,2558.65 5270.54,2570.47
  rectangle net NetC32_2: 5462.47,2720.07 5473.66,2740.38
  rectangle net GND: 5795.28,2442.6 5812.01,2459.65
  rectangle net GND: 5609.13,2487.73 5626.84,2507
  rectangle net GND: 5774.61,189.34 5793.31,207.05
  rectangle net NetIC2_43: 3955.71,2017.72 3969.49,2037.4
  rectangle net GND: 3907.48,1994.09 3924.21,2009.48
  rectangle net P3V3: 5330.58,2243.78 5517.59,2283.15
  rectangle net ADC_IN_P0: 1658.46,3456.69 1981.3,3571.85
  rectangle net ADC_IN_P1: 1658.46,3064.58 1981.3,3179.73
  rectangle net ADC_IN_P2: 1658.96,2667.57 1981.79,2782.73
  rectangle net ADC_IN_P3: 1658.46,2275.59 1981.3,2390.75
  rectangle net ADC_IN_P4: 1658.46,1881.89 1981.3,1997.05
  rectangle net ADC_IN_P5: 1658.46,1488.19 1981.3,1603.35
  rectangle net ADC_IN_P6: 1658.46,1094.49 1981.3,1209.65
  rectangle net ADC_IN_P7: 1658.46,700.79 1981.3,815.94
  rectangle net GND: 4436.02,2818.9 4475.39,2837.6
  rectangle net GND: 4526.57,3229.33 4606.3,3354.33
  rectangle net P5V0A: 4087.6,1374.02 4117.13,1428.15
  pour cut-out: 4518.21,3398.41 4518.21,2704.97 4884.6,2338.58 5441.93,2338.58 5441.93,2284.21 4870.07,2284.21 4488.68,2665.6 4488.68,3334.89 4478.84,3344.73 4478.84,3986.22 4518.21,3986.22
L3:
  rectangle net GND: 3801.93,1553.15 4001.97,1800.73
  rectangle net P5V0A: 4080.71,1380.91 4110.24,1424.21
  pour cut-out: 4518.21,3398.41 4518.21,2704.97 4880.96,2342.22 5442.91,2342.22 5442.91,2283.46 4870.82,2283.46 4488.68,2665.6 4488.68,3334.89 4478.84,3344.73 4478.84,3984.5 4518.21,3984.5
Bot:
  rectangle net N13V0: 4482.59,936.02 4491.76,981.08
  rectangle net N13V0: 4417.32,892.32 4491.76,981.08
  rectangle net P12V0: 5854.46,2386.81 5905.81,2438.58
  pour cut-out: 4518.21,3398.41 4518.21,2704.97 4881.64,2341.54 5433.07,2341.54 5433.07,2285.43 4868.85,2285.43 4488.68,2665.6 4488.68,3334.89 4478.84,3344.73 4478.84,3984.5 4518.21,3984.5
GP1(GND) (plane layer: these items are gaps in the copper):
  pour cut-out: 4518.21,3398.41 4518.21,2704.97 4881.64,2341.54 5488.19,2341.54 5488.19,2285.43 4868.85,2285.43 4488.68,2665.6 4488.68,3334.89 4478.84,3344.73 4478.84,3984.5 4518.21,3984.5

## Silkscreen, mask and mechanical layers (free items; w line width, h text height)
TopOverlay:
  drawing of 1239 lines, arcs and shapes, not listed
  text "Sampler v2.3.1" at 4018.7,3812.99 h80
  text "WUT ISE 2022" at 4125.98,3748.03 h40
  text "CH0" at 1453.74,3518.7 h40
  text "on" at 1693.41,3150.27 h40
  text "off" at 1319.39,3140.43 h40
  text "CH1" at 1483.27,3125 h40
  text "Bot ADC0" at 659.45,2933.07 h40 r90
  text "Up ADC1" at 718.5,2933.07 h40 r90
  text "ADC IN" at 836.61,2824.8 h40
  text "on" at 1683.56,2754.18 h40
  text "off" at 1309.55,2744.34 h40
  text "CH2" at 1483.27,2731.3 h40
  text "Termination" at 1898.62,2373.03 h40
  text "on" at 1693.41,2370.32 h40
  text "off" at 1319.39,2360.48 h40
  text "CH3" at 1473.43,2337.6 h40
  text "+12V" at 6072.83,2312.99 h40
  text "Bot ADC2" at 659.45,2194.88 h40 r90
  text "Up ADC3" at 718.5,2194.88 h40 r90
  text "EEM 1" at 5586.61,2180.12 h60 r90
  text "EEM 0" at 5878.94,2157.48 h60 r90
  text "+12V" at 4320.87,2086.61 h39.37 r90
  text "P3V3A" at 5709.26,2005.79 h40
  text "on" at 1683.56,1976.62 h40
  text "off" at 1309.55,1966.78 h40
  text "CH4" at 1473.43,1943.9 h40
  text "REF / VCC" at 4251.97,1881.1 h39.37
  text "on" at 1644.19,1582.92 h40
  text "off" at 1328.74,1574.8 h40
  text "CH5" at 1473.43,1550.2 h40
  text "Bot ADC4" at 659.45,1515.75 h40 r90
  text "Up ADC5" at 718.5,1515.75 h40 r90
  text "P2V5" at 4655.51,1486.22 h39.37
  text "N12VA" at 4250.98,1213.58 h40
  text "on" at 1693.41,1189.22 h40
  text "Termination" at 1907.48,1187.01 h40
  text "off" at 1319.39,1179.38 h40
  text "CH6" at 1473.43,1156.5 h40
  text "P6V0A" at 4926.38,1000.29 h39.37 r90
  text "P5V0A" at 4619.44,908.61 h39.37
  text "Bot ADC6" at 659.45,797.24 h40 r90
  text "Up ADC7" at 718.5,797.24 h40 r90
  text "on" at 1693.41,795.52 h40
  text "off" at 1319.39,785.68 h40
  text "CH7" at 1483.27,762.8 h40
  text "P3V3 / MP1" at 5204.72,475.39 h39.37
  text "SDA" at 5899.61,443.9 h39.37 r90
  text "I2C0" at 5959.65,371.06 h39.37 r90
  text "SCL" at 5895.67,318.9 h39.37 r90
  text "GND" at 5583.66,294.29 h39.37
  text "I2C1" at 5269.15,177.59 h39.37 r90
  text "SCL" at 5033.91,113.62 h39.37
  text "SDA" at 5161.87,111.65 h39.37
BottomOverlay:
  drawing of 1237 lines, arcs and shapes, not listed
  text "Sampler v2.3.1" at 5078.74,275.59 h80
  text "WUT ISE 2021" at 4803.64,119 h40
BottomSolder:
  rectangle: 3806.1,1554.13 4002.95,1795.28
Mechanical1:
  drawing of 299 lines, arcs and shapes, not listed
  text "Layer" at 350.14,5421.48 h60
  text "Name" at 760.05,5421.48 h60
  text "Material" at 1629.81,5421.48 h60
  text "Thickness" at 2489.58,5421.48 h60
  text "Constant" at 3139.42,5421.48 h60
  text "Board Layer Stack" at 3709.28,5421.48 h60
  text "TopOverlay" at 760.05,5301.48 h60
  text "TopSolder" at 760.05,5181.48 h60
  text "Solder Resist" at 1629.81,5181.48 h60
  text "0,40mil" at 2489.58,5181.48 h60
  text "3.5" at 3139.42,5181.48 h60
  text "1" at 350.14,5061.48 h60
  text "Top" at 760.05,5061.48 h60
  text "2,28mil" at 2489.58,5061.48 h60
  text "Dielectric1" at 760.05,4941.48 h60
  text "FR-4" at 1629.81,4941.48 h60
  text "7,09mil" at 2489.58,4941.48 h60
  text "4.8" at 3139.42,4941.48 h60
  text "2" at 350.14,4821.48 h60
  text "GP1(GND)" at 760.05,4821.48 h60
  text "1,42mil" at 2489.58,4821.48 h60
  text "Dielectric 3" at 760.05,4701.48 h60
  text "43,31mil" at 2489.58,4701.48 h60
  text "4.2" at 3139.42,4701.48 h60
  text "3" at 350.14,4581.48 h60
  text "L3" at 760.05,4581.48 h60
  text "1,42mil" at 2489.58,4581.48 h60
  text "Dielectric2" at 760.05,4461.48 h60
  text "FR-4" at 1629.81,4461.48 h60
  text "7,09mil" at 2489.58,4461.48 h60
  text "4.2" at 3139.42,4461.48 h60
  text "4" at 350.14,4341.48 h60
  text "Bot" at 760.05,4341.48 h60
  text "2,28mil" at 2489.58,4341.48 h60
  text "BottomSolder" at 760.05,4221.48 h60
  text "Solder Resist" at 1629.81,4221.48 h60
  text "0,40mil" at 2489.58,4221.48 h60
  text "3.5" at 3139.42,4221.48 h60
  text "BottomOverlay" at 760.05,4101.48 h60
Mechanical4:
  lines w39.37: 1220.47,196.85 1220.47,3740.16 4173.23,3740.16 4173.23,196.85 1220.47,196.85 ; 4606.3,2322.83 4606.3,3700.79 6181.1,3700.79 6181.1,2322.83 4606.3,2322.83
DrillDrawing:
  rectangle: 4531.5,2578.74 4606.3,2605.32

## Text inside footprints (layer, text, board x,y; h text height)
J1: TopOverlay "26" at 839.88,2582.87 h40 r90; Mechanical14 "26" at 839.88,2582.87 h40 r90
J2: TopOverlay "30" at 5444.13,822.79 h40 r270; Mechanical14 "30" at 5444.13,822.79 h40 r270
J13: TopOverlay "30" at 6183.12,821.79 h40 r270; Mechanical14 "30" at 6183.12,821.79 h40 r270